# Altium PCB Smart-Switch-v2.0.PcbDoc (part 3 of 3)
Units mil, origin at the board's own origin, x right, y up, seen from the top; angles counter-clockwise.
Board outline 1456.69 x 1377.95 mil, 4 copper layers (Top Layer, Power Layer, Ground Layer, Bottom Layer), stack 39.334 mil thick; 71 components, 41 nets, 221 pads, 302 vias.
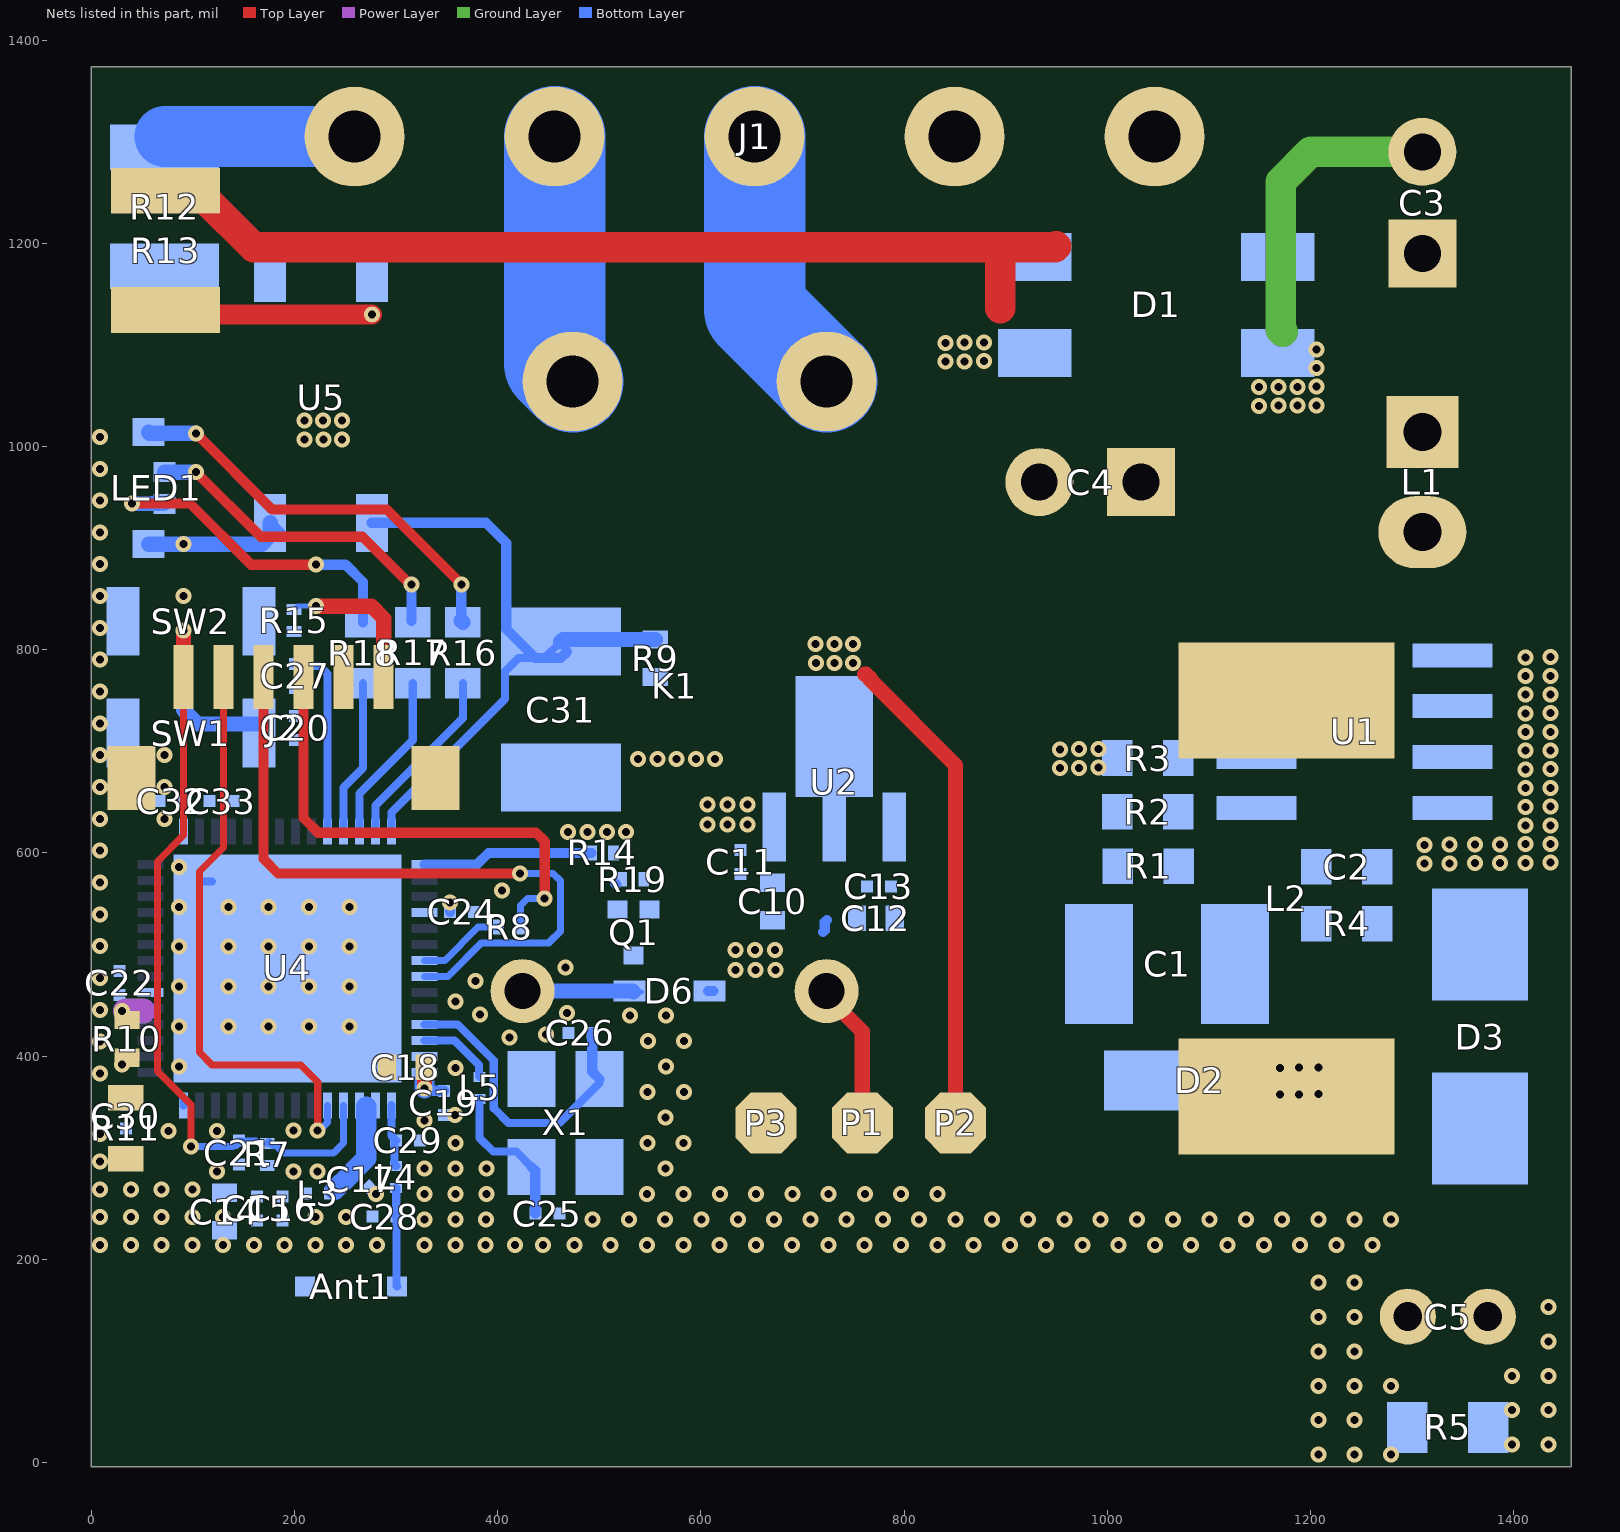
[diagram p4: the nets of this part, all layers, seen from the top]

## Via types
v1: diameter 15.75, hole 7.87, Top Layer to Bottom Layer, tented both sides, 302 vias

## Nets (pads, with @x,y where several pads share a name; then routed paths per layer and width w, separated by ;. In a path a pad name is that pad's centre, name@x,y a point inside that pad or via, vN(x,y) a via of type N, cw(c..) or ccw(c..) an arc to the next point about the centre after c; other vN are vias at no path point)
3V3: C12.2 C13.2 C14.2 C15.2 C16.2 C18.2 C19.2 C22.2 C24.2 J2.1 L3.1 LED1.1 P2.1 R7.2 R10.1 R15.2 U2.2 U4.20 U4.46 U4.55 U4.56 U5.4 | length 879.7
  Top Layer w15: v1(221.19,842.85) 275.7,842.85 287.74,830.81 287.74,773.27 J2.1@287.49,773.02 ; v1(327.95,368.35) C18.2@327.95,389 ; 761.01,775.76 762.39,775.76 766.65,771.5 766.65,770.12 850.51,686.26 P2.1@850.51,334.32
  Power Layer w25: v1@33.54,444.38 51.21,444.38
  Bottom Layer w5: R15.2@199.45,839.45 202.85,842.85 v1(221.19,842.85)
  Bottom Layer w10: U5.4@176,924.97 U5.4@186.75,914.22 ; v1(327.95,368.35) 329.5,368.35 331.96,365.9 C19.2@347.04,365.9 ; v1(353.11,551.03) v1(353.11,551.03) C24.2@353.06,542.08 ; 720.06,522.2 721.75,523.89 721.75,531.79 723.87,533.91 ; C24.2@353.01,542.03 C24.2@353.06,542.08
  Bottom Layer w15: LED1.1@56.13,903.88 v1(90.64,903.88) v1(90.64,903.88) 167.75,903.93 176,912.17 U5.4@176,924.97
  Bottom Layer w20: U4.56@327.84,384 327.95,383.9 v1(327.95,368.35)
  other v1: 38.85,268.94 69.13,268.94 99.4,268.94 30.26,444.38 713.06,787 731.45,787 749.84,787 712.87,805.84 731.26,805.84 749.65,805.84
5V: C5.1 C10.2 C11.2 D2.1 D6.2 K1.1 L2.2 P1.1 R5.2 U2.3 | length 149.8
  Top Layer w15: K1.1@723.61,464 723.61,459.41 758.74,424.27 P1.1@758.74,334.32
  Bottom Layer w10: D6.2@606.86,464.15 D6.2@608.37,464.15 D6.2@612.37,464.15
  other v1: 1398.23,17.57 1433.94,17.57 1398.23,51.48 1433.94,51.48 1398.23,85.39 1433.94,85.39 1433.94,119.3 1433.94,153.22 1169.94,362.24 1188.78,362.43 1207.62,362.61 1169.94,388.5 1188.78,388.69 1207.62,388.88 633.85,484.61 653.57,484.61 673.3,484.61 633.85,504.38 653.33,504.38 673.06,504.38 606.25,627.93 625.98,627.93 645.7,627.93 606.25,647.7 625.98,647.7 645.7,647.7
BUTTON_1: C27.2 R15.1 SW2.2 U4.38 | length 191
  Bottom Layer w8: C27.2@200.45,785.95 202.45,783.95 224.65,783.95 232.37,776.23 U4.38@232.37,621.21
EN: C20.2 C21.2 J2.6 R7.1 SW1.2 U4.4 | length 884.4
  Top Layer w7: J2.6@90.64,773.02 90.64,617.37 64.95,591.68 64.95,385.15 98,352.1 v1(98,311.09)
  Top Layer w15: J2.6@90.64,773.02 v1(90.64,819)
  Bottom Layer w7: v1(98,311.09) 98.15,310.94 139.25,310.94 140.41,312.11 142.81,312.11 144.52,313.81 144.52,316.21 161.96,316.21 ; R7.1@173,313.92 174.82,315.74 178.46,312.11 181.56,312.11 188.96,304.7 238.46,304.7 248.12,314.37 U4.4@248.12,351.52
  Bottom Layer w15: v1(90.64,819) 90.64,740.58 104.32,726.91 SW1.2@169.49,726.91
FB: R2.1 R3.2 U1.2
GND: Ant1.GND C3.2 C4.2 C5.2 C10.1 C11.1 C12.1 C13.1 C14.1 C15.1 C16.1 C17.1 C18.1 C19.1 C20.1 C21.1 C22.1 C24.1 C25.1 C26.1 C27.1 C28.1 C29.1 C30.1 C31.2 C32.1 C33.1 D1.2 D3.1 J2.2 J2.MP1 J2.MP2 P3.1 Q1.2 R5.1 R9.1 R11.1 R19.1 SW1.1 SW2.1 U2.1 U4.57 X1.2 X1.4 | length 331.3
  Top Layer w5: J2.MP2@25.91,660.06 J2.MP2@39.46,673.61
  Ground Layer w30: 1172.83,1113 1170.68,1115.15 1170.68,1260.71 1199.97,1290 C3.2@1310,1290
  Bottom Layer w5: v1@466.18,486.95 v1(466.72,487.43)
  Bottom Layer w8: U4.57@107.4,571.96 U4.57@118.77,571.96
  other v1: 1207.64,7.72 1243.35,7.72 1279.07,7.72 1207.64,41.64 1243.35,41.64 1207.64,75.55 1243.35,75.55 1279.07,75.55 1207.64,109.46 1243.35,109.46 1207.64,143.37 1243.35,143.37 1207.64,177.29 1243.35,177.29 8.57,214 38.85,214 69.13,214 99.4,214 129.68,214 159.96,214 190.23,214 220.51,214 250.79,214 281.07,214 328,214 358.28,214 387.99,214 416.88,214 444.7,214 475.42,214 511.13,214 546.84,214 582.55,214 618.27,214 653.98,214 689.69,214 725.41,214 761.12,214 796.83,214 832.54,214 868.26,214 903.97,214 939.68,214 975.39,214 1011.11,214 1046.82,214 1082.53,214 1118.25,214 1153.96,214 1189.67,214 1225.38,214 1261.1,214 328,239.09 358.28,239.09 388.39,239.09 493.39,239.09 529.1,239.09 564.81,239.09 600.52,239.09 636.24,239.09 671.95,239.09 707.66,239.09 743.38,239.09 779.09,239.09 814.8,239.09 850.51,239.09 886.23,239.09 921.94,239.09 957.65,239.09 993.37,239.09 1029.08,239.09 1064.79,239.09 1100.5,239.09 1136.22,239.09 1171.93,239.09 1207.64,239.09 1243.35,239.09 1279.07,239.09 8.57,241.66 38.85,241.66 69.13,241.66 99.4,241.66 129.68,241.66 220.51,241.66 250.79,241.66 280.07,264.19 328,264.19 358.28,264.19 388.79,264.19 547.07,264.19 582.78,264.19 618.49,264.19 654.21,264.19 689.92,264.19 725.63,264.19 761.35,264.19 797.06,264.19 832.77,264.19 8.57,268.94 123.72,286.5 198.97,286.5 222.75,286.5 328,289.28 358.28,289.28 388.79,289.28 565.04,289.28 8.57,296.21 358.28,314.38 547.3,314.38 583.01,314.38 8.57,323.49 76,326.32 123.72,326.32 198.97,326.85 328,336.56 565.27,339.47 358,342.19 547.52,364.57 583.24,364.57 8.57,382.95 358.28,388.33 86,389.67 565.49,389.66 8.57,414.28 547.75,414.76 583.46,414.76 411.41,418.14 447.51,421.51 86,429 134.73,429 174.46,429 214.19,429 253.92,429 530.01,439.85 565.72,439.85 382.54,441.19 468.15,442.66 8.57,445.6 358.28,453.91 86,468.33 134.73,468.33 174.46,468.33 214.19,468.33 253.92,468.33 377.82,474.16 8.57,476.93 86,507.67 134.73,507.67 174.46,507.67 214.19,507.67 253.92,507.67 8.57,508.25 8.57,539.57 86,547 134.73,547 174.46,547 214.19,547 253.92,547 404.16,562.95 8.57,570.9 86,586.33 8.57,602.22 469.32,620.75 488.32,620.75 507.32,620.75 526.32,620.75 8.57,633.55 71.95,633.55 8.57,664.87 71.95,664.87 538,692.23 557,692.23 576,692.23 595,692.23 614,692.23 8.57,696.19 71.95,696.19 8.57,727.52 8.57,758.84 8.57,790.16 8.57,821.49 8.57,852.81 90.64,852.81 8.57,884.14 8.57,915.46 8.57,946.78 8.57,978.11 209.94,1006.88 228.33,1006.88 246.72,1006.88 8.57,1009.43 209.76,1025.72 228.15,1025.72 246.54,1025.72 1149.33,1039.98 1168.17,1040.17 1187.01,1040.35 1205.85,1040.54 1149.33,1058.37 1168.17,1058.56 1187.01,1058.74 1205.85,1058.93 1205.85,1077.32 1205.85,1095.71
GPIO37: C31.1 R9.2 U4.42 U5.3 | length 652.8
  Bottom Layer w8: U4.42@295.36,621.21 295.36,639.84 406.94,751.43 406.94,778.41 420.41,791.87 C31.1@434.69,791.87 ; C31.1@446,791.87 C31.1@462,807.87
  Bottom Layer w10: U5.3@276,924.97 388.41,924.97 408.38,905 408.38,820.34 436.85,791.87 446,791.87 462,791.87 C31.1@468.27,798.14
  Bottom Layer w15: C31.1@462,807.87 464.27,810.14 R9.2@554.89,810.14
GPIO38: R14.1 U4.43 | length 169
  Bottom Layer w10: U4.43@327.84,588.72 379.6,588.72 390.88,600 R14.1@492.17,600
I: J1.3 K1.4 | length 270.4
  Bottom Layer w100: J1.3@652.78,1305.03 652.78,1134.83 K1.4@723.61,1064
IO0: J2.5 U4.5 | length 585
  Top Layer w7: J2.5@130.01,773.02 130.01,605.47 106.27,581.73 106.27,403.79 118.95,391.1 206.16,391.1 222.75,374.51 v1(222.75,326.85)
  Bottom Layer w7: v1@222.75,326.99 224.72,326.99 232.37,334.64 U4.5@232.37,351.52
LED_B: R18.2 U4.39 | length 153.7
  Bottom Layer w8: U4.39@248.12,621.21 248.12,664.5 267.25,683.64 R18.2@267.25,767.02
LED_G: R17.2 U4.40 | length 167.6
  Bottom Layer w8: U4.40@263.87,621.21 263.87,658.61 316.35,711.09 R17.2@316.35,767.02
LED_R: R16.2 U4.41 | length 181.5
  Bottom Layer w8: U4.41@279.62,621.21 279.62,646.55 365.7,732.63 R16.2@365.7,767.02
LIVE: D1.4 J1.2
NetAnt1_ANT#: Ant1.ANT# C28.2 L4.1 | length 97.9
  Bottom Layer w8.19: C28.2@299.35,242.12 300,242.77 L4.1@300,270.17 ; C28.2@300,242.47 300.35,242.12 300.35,174.79 ccw(c302.56,174.79) Ant1.ANT#@301,173.23
NetC1_1: C1.1 D2.2 R1.2 R2.2
NetC1_2: C1.2 R4.2
NetC2_1: C2.1 D3.2 L2.1 R3.1 R4.1 U1.5 U1.6 U1.7 U1.8
  other v1: 1311.92,589.49 1336.76,589.68 1361.6,589.86 1386.44,590.05 1411.28,590.24 1436.12,590.42 1311.92,607.88 1336.76,608.07 1361.6,608.25 1386.44,608.44 1411.28,608.63 1436.12,608.81 1411.28,627.02 1436.12,627.2 1411.28,645.41 1436.12,645.6 1411.28,663.8 1436.12,663.99 1411.28,682.19 1436.12,682.38 953.32,683.63 972.16,683.81 991,684 1411.28,700.58 1436.12,700.77 953.32,702.02 972.16,702.2 991,702.39 1411.28,718.97 1436.12,719.16 1411.28,737.36 1436.12,737.55 1411.28,755.75 1436.12,755.94 1411.28,774.14 1436.12,774.33 1411.28,792.53 1436.12,792.72
NetC2_2: C2.2 R1.1 U1.1
NetC3_1: C3.1 D1.1 L1.1
NetC4_1: C4.1 L1.2 U1.4
NetC17_2: C17.2 L3.2 U4.2 U4.3 | length 92.1
  Bottom Layer w20: 239.52,268.28 C17.2@255.65,284.41 ; C17.2@257.43,286.35 270.45,299.37 270.45,350.23
NetC29_2: C29.2 L4.2 U4.1 | length 62.8
  Bottom Layer w8.19: U4.1@295.36,351.52 295.36,321.64 C29.2@300,317 ; C29.2@298.36,317 298.36,292.65 299.18,291.83 L4.2@300,291.83
NetC32_2: C32.2 C33.2 U4.29
NetD6_1: D6.1 K1.2 Q1.3 | length 117.6
  Bottom Layer w5: D6.1@533.63,463.15 D6.1@541.63,463.15
  Bottom Layer w15: K1.2@424.39,464 532.78,464 D6.1@533.63,463.15
NetL5_1: L5.1 U4.54 | length 75.5
  Bottom Layer w8: U4.54@327.84,415.5 357.3,415.5 381.67,391.12 381.67,380.57 382,380.25 L5.1@382,379.65
NetLED1_2: LED1.2 R18.1 | length 330
  Top Layer w10: v1(40,944) 97,944 157.32,883.68 v1(220.91,883.68)
  Bottom Layer w10: v1(220.91,883.68) 250.19,883.68 267.25,866.62 R18.1@267.25,827.02
  Bottom Layer w15: v1(40,944) LED1.2@71.13,944
NetLED1_3: LED1.3 R17.1 | length 321.8
  Top Layer w10: v1(102.99,974.75) 166.53,911.21 266.83,911.21 v1@311.36,866.67
  Bottom Layer w5: R17.1@315.09,828.27 R17.1@316.35,827.02
  Bottom Layer w10: R17.1@315.09,828.27 v1(315.09,864)
  Bottom Layer w15: LED1.3@71.87,974.75 v1(102.99,974.75)
NetLED1_4: LED1.4 R16.1 | length 408.2
  Top Layer w10: v1(103,1013) 178.07,937.93 290.88,937.93 364.09,864.71 v1(364.09,864)
  Bottom Layer w10: R16.1@364.09,828.63 v1(364.09,864)
  Bottom Layer w15: LED1.4@56.13,1014.12 57.25,1013 v1(103,1013) ; R16.1@364.09,828.63 R16.1@365.7,827.02
NetQ1_1: Q1.1 R14.2 R19.2 | length 1.4
  Bottom Layer w10: 515.62,570.02 516.64,569
NetR8_1: R8.1 U4.49 | length 86.9
  Bottom Layer w7: U4.49@327.84,494.24 347.95,494.24 380.66,526.95 R8.1@401.16,526.95
NetR12_2: R12.2 U5.1
NetR13_2: R13.2 U5.2 | length 174
  Top Layer w20: R13.2@102,1130 v1(276,1130)
NEUTRAL: D1.3 J1.1 R13.1 | length 960.2
  Top Layer w30: R13.1@73,1251.66 104.1,1251.66 R13.1@111.54,1244.22 ; R13.1@111.54,1244.17 159.69,1196.03 894.34,1196.03 ; 894.34,1136 894.34,1196.03 ; 949.68,1197 948.71,1196.03 894.34,1196.03
  other v1: 840.71,1083.67 859.55,1083.86 878.39,1084.04 840.71,1102.06 859.55,1102.25 878.39,1102.43
NTC_TEMP: C30.2 R10.2 R11.2 U4.14 | length 8.2
  Bottom Layer w8: U4.14@90.31,359.54 90.64,359.21 U4.14@90.64,351.52
  other v1: 30.26,391.87
O: J1.4 K1.3 | length 248.4
  Bottom Layer w100: J1.4@455.93,1305.03 455.93,1081.68 K1.3@473.61,1064
RXD: J2.4 U4.50 | length 681.7
  Top Layer w10: J2.4@169.49,772.91 169.49,594.06 183.72,579.83 v1(422,579.83)
  Bottom Layer w7: U4.50@327.84,478.49 350.87,478.49 383.91,511.53 450.17,511.53 461.56,522.92 461.56,572.67 454.41,579.83 v1(422,579.83)
SWITCH: J1.5 R12.1 | length 187.3
  Bottom Layer w5: R12.1@72,1294.66 R12.1@72.53,1295.19
  Bottom Layer w60: R12.1@72.53,1305.03 J1.5@259.08,1305.03
TXD: J2.3 R8.2 | length 486.8
  Top Layer w10: J2.3@208.75,773.02 208.75,634.35 223.2,619.89 437.67,619.89 446.19,611.37 v1(446.19,555.14)
  Bottom Layer w7: R8.2@422.23,530.06 422.23,548.18 429.19,555.14 v1(446.19,555.14)
XTAL_IN: C25.2 L5.2 X1.1 | length 149
  Bottom Layer w8: L5.2@382,358 382,319.59 395.51,306.08 418.12,306.08 X1.1@433.25,290.95
  Bottom Layer w10: X1.1@433.25,290.95 436.91,287.29 C25.2@436.91,245
XTAL_OUT: C26.2 U4.53 X1.3 | length 308.7
  Bottom Layer w8: U4.53@327.84,431.24 360.61,431.24 396,395.86 396,348.75 410.5,334.25 460.8,334.25 480.55,354 500.18,373.62 X1.3@500.18,377.56
  Bottom Layer w10: C26.2@493.04,423 493.04,384.7 X1.3@500.18,377.56
pads on no net: U4.6 U4.7 U4.8 U4.9 U4.10 U4.11 U4.12 U4.13 U4.15 U4.16 U4.17 U4.18 U4.19 U4.21 U4.22 U4.23 U4.24 U4.25 U4.26 U4.27 U4.28 U4.30 U4.31 U4.32 U4.33 U4.34 U4.35 U4.36 U4.37 U4.44 U4.45 U4.47 U4.48 U4.51 U4.52

## Polygon pours and split planes (outlines as drawn)
5V on Power Layer "5V_L02_P003" (solid, pour order 3): 1456.73,475.33 1456.69,447.97 1456.69,-3.98 1328.74,-3.98 1328.74,317.26 1306.14,339.86 746.85,339.86 636.24,450.47 622.71,464 611.74,464 555.61,464 544.28,475.33 544.28,653.62 552.59,661.92 748.22,661.92 756.68,653.46 756.68,538.59 819.94,475.33
GND on Power Layer "GND_L02_P006" (solid, remove dead copper, pour order 6): 891,574.24 915.48,549.76 1456.69,549.76 1456.69,327 1323.22,327 1323.22,-3.98 1190.86,-3.98 1190.86,201 0,201 0,1046.28 296.45,1046.28 307,1035.73 307,938 318.87,926.13 856.07,926.13 916.07,986.13 956.66,947.52 891,881.86
3V3 on Power Layer "3V3_L02_P004" (solid, remove dead copper, pour order 4): 338.04,358.59 343.28,363.83 343.28,393.72 338.13,398.87 122.32,398.87 114.62,406.57 114.62,697.57 126.9,709.85 313.25,709.85 327.7,695.4 327.7,534.33 334.18,527.85 372.03,527.85 379.32,535.14 379.32,693.75 395.43,709.85 753.63,709.85 762.48,718.7 762.48,823.04 752.55,832.97 288.29,832.97 264.37,856.9 168.53,856.9 160,865.43 160,910.07 150.07,920 98.07,920 54.19,920 45.36,911.18 45.36,384.43 26.29,365.35 26.29,257.56 110.81,257.56 110.81,285.47 70.16,285.47 58.72,296.91 58.72,343.72 73.59,358.59 120.74,358.59 303.85,358.59
NEUTRAL on Top Layer "NEUTRAL_L01_P007" (solid, pour order 7): 997.27,1305.03 1095.69,1305.03 1095.69,1187.67 968.03,1060 828.24,1060 828.24,1212 976.91,1212 997.27,1232.36
GND on Top Layer "GND_L01_P001" (solid, remove dead copper, pour order 1): 867.13,926.13 923.14,982.13 954.51,950.75 909.34,905.58 909.34,544.72 1456.69,544.72 1456.69,442.8 1046.82,442.8 1046.82,281 1323.22,281 1323.22,-3.98 1190.86,-3.98 1190.86,201 0,201 0,1045.94 307,1045.94 307,971 351.87,926.13
GND on Bottom Layer "GND_L04_P000" (solid, pour order 0): 871.88,930.88 923.14,982.13 954.51,950.75 909.34,905.58 909.34,321.91 1323.22,321.91 1323.22,-3.98 1190.86,-3.98 1190.86,201 0,201 0,1046.22 293.28,1046.22 293.28,930.88
GND on Ground Layer "GND_L03_P002" (solid, remove dead copper, pour order 2): 0,1045.94 293.28,1045.94 307,1032.23 307,938 320,925 909.34,925 909.34,965 956.66,965 956.66,932.21 956.66,764.38 966.78,754.26 1110.27,754.27 1120,764 1120,1127.13 1133.02,1140.15 1210.85,1140.15 1223,1128 1223,570 1240.17,552.83 1456.69,552.83 1456.69,-3.98 1190.86,-3.98 1190.86,201 0,201

## Other copper
Top Layer:
  rectangle net 3V3: 692.91,764 774.15,828.16
  rectangle net 5V: 1346.84,-3.98 1456.69,417.58
  rectangle net 5V: 1089.57,303.41 1456.69,417.58
  rectangle net NetC2_1: 935,567.31 1456.69,807.34
  rectangle net 3V3: 22.5,426.5 47.67,452.61
  rectangle net GND: 8.57,850.99 91.54,854.81
  rectangle net GND: 69.95,630.25 74.13,696.19
  rectangle net NTC_TEMP: 22.5,349.55 47.5,407.5
  rectangle net GND: 119,413 269,563
Bottom Layer:
  rectangle net GND: 778.89,521.86 801.72,607.28
  rectangle net 5V: 592.62,453.91 723.61,474.39
  rectangle net 5V: 660.78,557.69 683.61,605.76
  rectangle net 5V: 592.62,615.83 683.61,659.49
  rectangle net 3V3: 719.83,557.69 742.67,607.52
  rectangle net 5V: 633.15,453.91 683.61,513.74
  rectangle net 5V: 633.15,555.53 683.61,587.61
  rectangle net 3V3: 693.2,654.96 769.3,819.14
  rectangle net 3V3: 713.54,516.38 772.15,587.61
  rectangle net 5V: 592.62,453.91 646.86,587.61
  rectangle net NEUTRAL: 828.24,1068.45 964.67,1115.7
  rectangle net GND: 1131.32,1028.54 1223,1115.7
  rectangle net LIVE: 801.05,1162.93 964.68,1222.18
  rectangle net LIVE: 800.42,1162.93 898.84,1305.03
  rectangle net FB: 1054.84,682.61 1220.71,710.92
  rectangle net FB: 1054.84,682.61 1186.13,710.92
  rectangle net NetC2_2: 1107.39,632.61 1186.13,656.23
  rectangle net 5V: 1116.96,346.64 1220.71,405.69
  rectangle net NetC4_1: 1041.54,841.46 1456.69,954
  rectangle net GND: 1250.71,273.46 1456.69,405.69
  rectangle net 5V: 1346.84,-3.98 1456.69,252.95
  rectangle net GND: 1131.32,1068.45 1203.76,1115.7
  rectangle net NetC4_1: 1041.54,913.63 1223,998.46
  rectangle net NetC2_1: 939.7,675.03 1025.24,710.92
  rectangle net NetC2_1: 1250.71,431.65 1456.69,806.23
  rectangle net NetC1_1: 939.7,346.64 1025.24,657.9
  rectangle net NetC4_1: 999.54,782.61 1220.71,954
  rectangle net NetC3_1: 1131.33,1162.93 1345.43,1229.86
  rectangle net NetC3_1: 1251,978.78 1456.69,1229.86
  rectangle net NetC1_1: 995,475.33 1025,657.9
  rectangle net NetC1_2: 1055,431.65 1220.71,549.76
  rectangle net NetC2_2: 1107.39,568.96 1220.71,656.23
  rectangle net NetC2_2: 1055,568.96 1141.46,604.5
  rectangle net FB: 1054.83,622.9 1084.84,710.92
  rectangle net SWITCH: 18.46,1255.82 308.29,1354.24
  rectangle net 3V3: 21.94,436.11 38.81,467.07
  rectangle net 3V3: 28.28,255.93 109.81,281.6
  rectangle net NetQ1_1: 508.04,535.55 527.72,607.28
  rectangle net GND: 538.29,535.55 559.22,607.28
  rectangle net NetC29_2: 290.81,311.09 305.91,322.91
  rectangle net 3V3: 165.72,270.93 180.28,292.27
  rectangle net EN: 139.31,308.61 184.61,323.81
  rectangle net 3V3: 28.28,255.93 217.09,274.5
  rectangle net NetC17_2: 228.91,255.93 246.78,273.91
  rectangle net 3V3: 315.05,537.15 349.34,547.15
  region net NTC_TEMP: 34.73,395.67 24.95,395.67 24.95,346.63 34.73,346.63
  rectangle net NetC32_2: 84.71,645.09 122.09,656.95
  rectangle net BUTTON_1: 148.79,779.84 206.73,823.11
  rectangle net EN: 148.79,684.14 206.35,718
  rectangle net NetC32_2: 86.31,608.41 94.97,656.95
  rectangle net 3V3: 21.94,458.41 70.95,467.07
  rectangle net NTC_TEMP: 27.94,346.63 94.97,364.32
  rectangle net 3V3: 192.17,834.14 220.79,851.62
  rectangle net GND: 194.54,728.91 206.35,768.24
  rectangle net NetR13_2: 260.25,1113.21 291.75,1199.57
  rectangle net NetD6_1: 513.88,453.91 549.77,508
  rectangle net NetR12_2: 18.46,1113.21 191.75,1199.78
  rectangle net GND: 198.2,173.23 222.8,230.63
  rectangle net NetC17_2: 259.54,338.72 283.95,351.52
  rectangle net NetC17_2: 259.54,338.72 283.95,364.32
  rectangle net 3V3: 315.05,373.84 340.64,404.08
  region net NTC_TEMP: 37.64,364.13 37.65,361.46 30.26,361.46 30.26,369.99 33.71,369.99 33.71,368.06 ccw(c37.64,368.06)
  region net NTC_TEMP: 82.64,347.02 82.64,349.69 90.02,349.69 90.02,341.16 86.57,341.16 86.57,343.09 ccw(c82.64,343.09)
  region net GND: 81.08,583.36 ccw(c61.24,583.36) 61.24,603.2 59.75,603.2 59.75,610.22 cw(c63.52,610.22) 63.52,613.98 76.03,613.98 ccw(c91.3,613.98) 91.3,598.71 95.56,598.71 95.56,596.54 cw(c81.08,596.54) 81.08,582.06
  region net GND: 289.85,598.57 ccw(c289.85,618.41) 309.69,618.41 309.69,619.89 316.71,619.89 cw(c316.71,616.13) 320.47,616.13 320.47,602.89 ccw(c320.47,587.62) 305.21,587.62 305.21,584.09 303.03,584.09 cw(c303.03,598.57) 288.55,598.57

## Silkscreen, mask and mechanical layers (free items; w line width, h text height)
Top Overlay:
  text "GND" at 623.42,256.32 h40
  text "5V" at 735.59,256.32 h40
  text "3V" at 829.17,256.32 h40
Bottom Overlay:
  drawing of 50 lines, arcs and shapes, not listed
  text "GPIO" at 148.19,887.71 h30
  text "RESET" at 278.86,672.74 h30
  text "$" at 853.22,272.93 h40 r270
  text "$" at 349.59,217 h40 r270
Bottom Solder:
  lines w60: 455.93,1081.68 455.93,1314.87
  lines w70: 652.78,1314.87 652.78,1134.83 723.61,1064
Dimensions:
  drawing of 295 lines, arcs and shapes, not listed
  text "Layer" at -164.42,3270 h60
  text "Name" at 245.49,3270 h60
  text "Material" at 1175.23,3270 h60
  text "Thickness" at 2035,3270 h60
  text "Constant" at 2684.84,3270 h60
  text "Board Layer Stack" at 3254.7,3270 h60
  text "Top Overlay" at 245.49,3150 h60
  text "Top Solder" at 245.49,3030 h60
  text "Solder Resist" at 1175.23,3030 h60
  text "0.010mm" at 2035,3030 h60
  text "3.8" at 2684.84,3030 h60
  text "1" at -164.42,2910 h60
  text "Top Layer" at 245.49,2910 h60
  text "0.035mm" at 2035,2910 h60
  text "Dielectric 2" at 245.49,2790 h60
  text "PP-006" at 1175.23,2790 h60
  text "0.130mm" at 2035,2790 h60
  text "4.6" at 2684.84,2790 h60
  text "2" at -164.42,2670 h60
  text "Power Layer" at 245.49,2670 h60
  text "CF-004" at 1175.23,2670 h60
  text "0.035mm" at 2035,2670 h60
  text "Dielectric 1" at 245.49,2550 h60
  text "FR-4" at 1175.23,2550 h60
  text "0.600mm" at 2035,2550 h60
  text "4.8" at 2684.84,2550 h60
  text "3" at -164.42,2430 h60
  text "Ground Layer" at 245.49,2430 h60
  text "CF-004" at 1175.23,2430 h60
  text "0.035mm" at 2035,2430 h60
  text "Dielectric 3" at 245.49,2310 h60
  text "PP-006" at 1175.23,2310 h60
  text "0.130mm" at 2035,2310 h60
  text "4.6" at 2684.84,2310 h60
  text "4" at -164.42,2190 h60
  text "Bottom Layer" at 245.49,2190 h60
  text "0.035mm" at 2035,2190 h60
  text "Bottom Solder" at 245.49,2070 h60
  text "Solder Resist" at 1175.23,2070 h60
  text "0.010mm" at 2035,2070 h60
  text "3.8" at 2684.84,2070 h60
  text "Bottom Overlay" at 245.49,1950 h60
  text "Total board thickness:" at -164.42,1830 h60
  text "1.019mm" at 2035,1830 h60
Board Outline:
  lines w5: 364.09,1027.63 364.09,1119.22 ccw(c354.09,1119.22) 354.09,1129.22 ccw(c354.09,1119.22) 344.09,1119.22 344.09,1018.83 396.79,966.13 527.87,966.13 758.37,966.13 812.04,1019.8 812.04,1119.22 ccw(c802.04,1119.22) 802.04,1129.22 ccw(c802.04,1119.22) 792.04,1119.22 792.04,1027.33 750.84,986.13 527.87,986.13 406,986.13 364.5,1027.63 ; 934.7,1348 cw(c944.7,1348) 944.7,1358 cw(c944.7,1348) 954.7,1348 ; 934.7,1348 934.7,1264.98 ccw(c944.7,1264.98) 944.7,1254.98 ccw(c944.7,1264.98) 954.7,1264.98 954.7,1348 ; 934.7,1348 934.7,1348 ; 954.7,1348 954.7,1348 ; 0,-3.98 1456.69,-3.98 1456.69,1373.98 0,1373.98 0,-3.98 ; 16,1081 ccw(c26,1081) 26,1071 30.14,1071 308.02,1071 ccw(c308.02,1081) 318.02,1081 ccw(c308.02,1081) 308.02,1091 30.14,1091 26,1091 ccw(c26,1081) 16,1081 ; 344.15,1245.98 ccw(c354.15,1245.98) 354.15,1235.98 ccw(c354.15,1245.98) 364.15,1245.98 364.15,1343.86 364.15,1348 ccw(c354.15,1348) 354.15,1358 ccw(c354.15,1348) 344.15,1348 344.15,1343.86 344.15,1245.98 ; 541,1245.98 ccw(c551,1245.98) 551,1235.98 ccw(c551,1245.98) 561,1245.98 561,1343.86 561,1348 ccw(c551,1348) 551,1358 ccw(c551,1348) 541,1348 541,1343.86 541,1245.98 ; 737.85,1245.98 ccw(c747.85,1245.98) 747.85,1235.98 ccw(c747.85,1245.98) 757.85,1245.98 757.85,1343.86 757.85,1348 ccw(c747.85,1348) 747.85,1358 ccw(c747.85,1348) 737.85,1348 737.85,1343.86 737.85,1245.98
Drill Drawing:
  circle w10: c-136.17,4397.33 r33.33
  lines w10: -169.5,3680.67 -102.83,3680.67 -136.17,3614 -169.5,3680.67 ; -169.5,3764 -102.83,3764 -102.83,3830.67 -169.5,3830.67 -169.5,3764 ; -169.5,3914 -136.17,3930.67 -102.83,3914 -119.5,3947.33 -102.83,3980.67 -136.17,3964 -169.5,3980.67 -152.83,3947.33 -169.5,3914 ; -169.5,4080.67 -152.83,4080.67 -136.17,4064 -119.5,4080.67 -102.83,4080.67 -119.5,4097.33 -102.83,4114 -119.5,4114 -136.17,4130.67 -152.83,4114 -169.5,4114 -152.83,4097.33 -169.5,4080.67 ; -169.5,4230.67 -152.83,4230.67 -152.83,4214 -119.5,4214 -119.5,4230.67 -102.83,4230.67 -102.83,4264 -119.5,4264 -119.5,4280.67 -152.83,4280.67 -152.83,4264 -169.5,4264 -169.5,4230.67
  lines w15: -229.29,3569 7380.61,3569 ; -229.29,4469 7380.61,4469 ; 321.58,3419 321.58,4619 ; 911.43,3419 911.43,4619 ; 2011.11,3419 2011.11,4619 ; 2516.98,3419 2516.98,4619 ; 3250.79,3419 3250.79,4619 ; 4750.34,3419 4750.34,4619 ; 5340.18,3419 5340.18,4619 ; 6085.98,3419 6085.98,4619 ; -229.29,3419 7380.61,3419 7380.61,4619 -229.29,4619 -229.29,3419
  text "Symbol" at -139.29,4514 h72
  text "Count" at 366.58,4514 h72
  text "Hole Size" at 956.43,4514 h72
  text "Plated" at 2056.11,4514 h72
  text "Hole Type" at 2561.98,4514 h72
  text "Drill Layer Pair" at 3295.79,4514 h72
  text "Via/Pad" at 4795.34,4514 h72
  text "Pad Shape" at 5385.18,4514 h72
  text "Template" at 6130.98,4514 h72
  text "2" at 366.58,4364 h60
  text "28.35mil (0.720mm)" at 956.43,4364 h60
  text "PTH" at 2056.11,4364 h60
  text "Round" at 2561.98,4364 h60
  text "Top Layer - Bottom Layer" at 3295.79,4364 h60
  text "Pad" at 4795.34,4364 h60
  text "Rounded" at 5385.18,4364 h60
  text "c140h72m145mx145p140" at 6130.98,4364 h60
  text "2" at 366.58,4214 h60
  text "35.43mil (0.900mm)" at 956.43,4214 h60
  text "PTH" at 2056.11,4214 h60
  text "Round" at 2561.98,4214 h60
  text "Top Layer - Bottom Layer" at 3295.79,4214 h60
  text "Pad" at 4795.34,4214 h60
  text "Rounded" at 5385.18,4214 h60
  text "c160h90" at 6130.98,4214 h60
  text "2" at 366.58,4064 h60
  text "37.40mil (0.950mm)" at 956.43,4064 h60
  text "PTH" at 2056.11,4064 h60
  text "Round" at 2561.98,4064 h60
  text "Top Layer - Bottom Layer" at 3295.79,4064 h60
  text "Pad" at 4795.34,4064 h60
  text "(Mixed)" at 5385.18,4064 h60
  text "(Mixed)" at 6130.98,4064 h60
  text "4" at 366.58,3914 h60
  text "36.22mil (0.920mm)" at 956.43,3914 h60
  text "PTH" at 2056.11,3914 h60
  text "Round" at 2561.98,3914 h60
  text "Top Layer - Bottom Layer" at 3295.79,3914 h60
  text "Pad" at 4795.34,3914 h60
  text "(Mixed)" at 5385.18,3914 h60
  text "(Mixed)" at 6130.98,3914 h60
  text "7" at 366.58,3764 h60
  text "51.18mil (1.300mm)" at 956.43,3764 h60
  text "PTH" at 2056.11,3764 h60
  text "Round" at 2561.98,3764 h60
  text "Top Layer - Bottom Layer" at 3295.79,3764 h60
  text "Pad" at 4795.34,3764 h60
  text "Rounded" at 5385.18,3764 h60
  text "c250h130" at 6130.98,3764 h60
  text "302" at 366.58,3614 h60
  text "7.87mil (0.200mm)" at 956.43,3614 h60
  text "PTH" at 2056.11,3614 h60
  text "Round" at 2561.98,3614 h60
  text "Top Layer - Bottom Layer" at 3295.79,3614 h60
  text "Via" at 4795.34,3614 h60
  text "Rounded" at 5385.18,3614 h60
  text "v40h20m0mx0" at 6130.98,3614 h60
  text "319 Total" at 366.58,3464 h60

## Dimensions
0,1373.98 to 1456.69,1373.98 on Dimensions
1456.69,-3.98 to 1456.69,1373.98 on Dimensions